# Altium PCB Fast_Servo.PCBDOC (part 4 of 11)
Units mm, origin at the board's own origin, x right, y up, seen from the top; angles counter-clockwise.
Board outline 162.48 x 100 mm, 6 copper layers (Top, GP1(GND), L3, L4, P3V3, Bot), stack 1.716 mm thick; 668 components, 491 nets, 2308 pads, 1133 vias.
Unrouted connection lines stored in the file: 2.
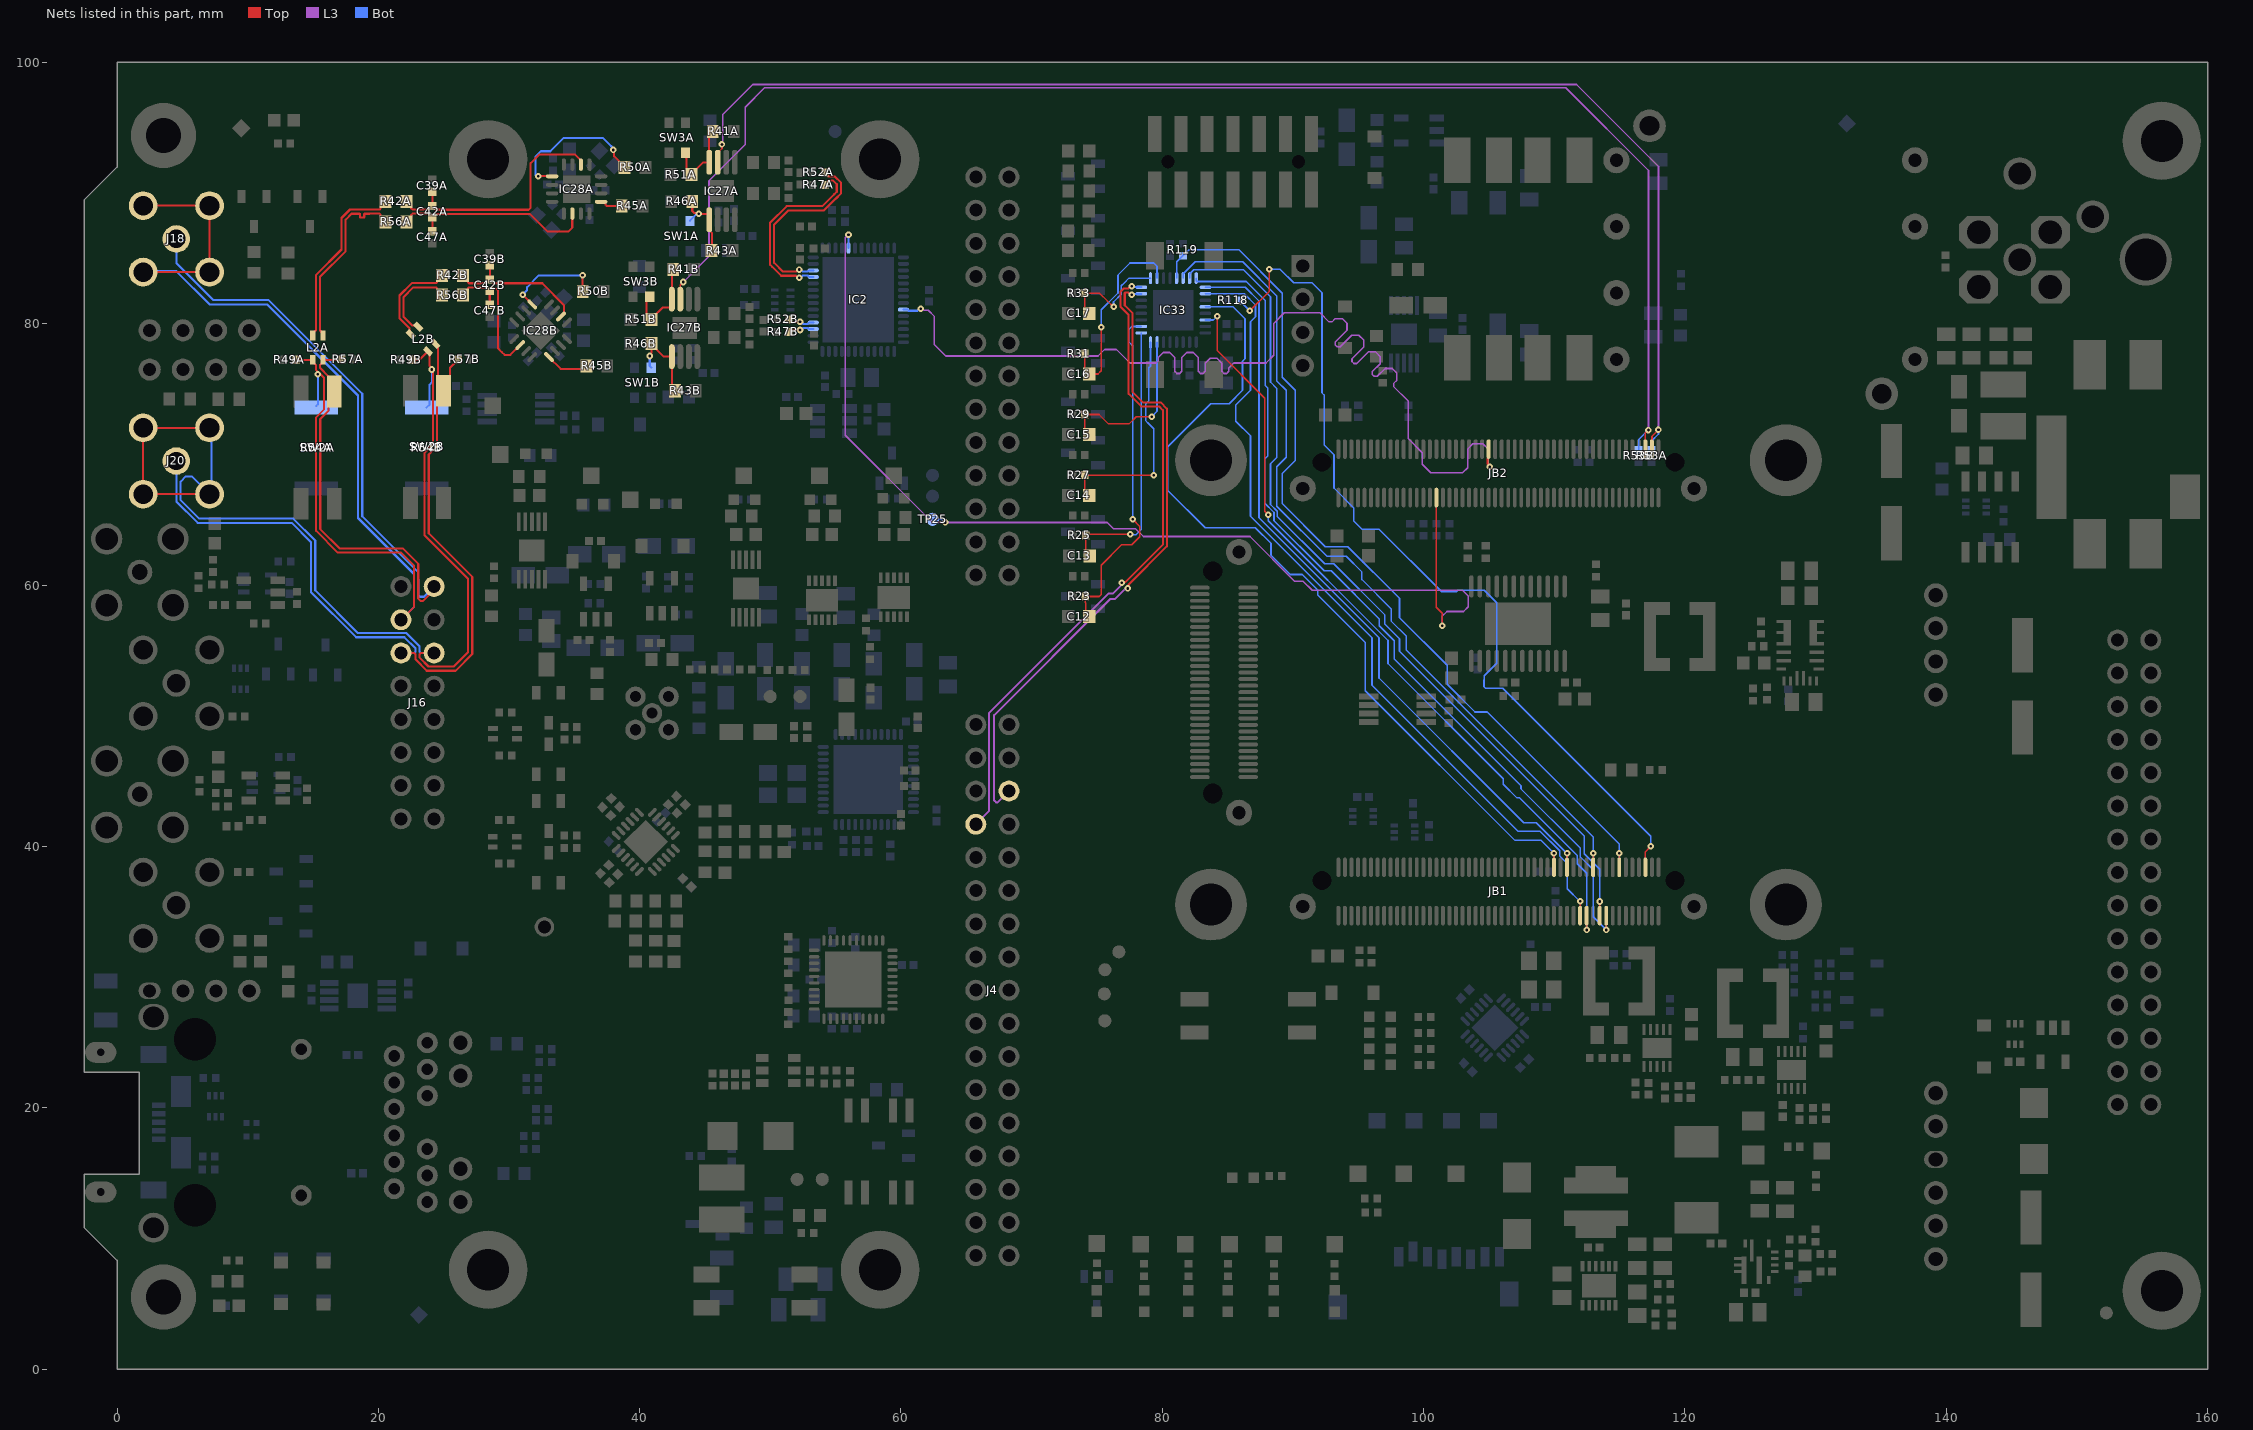
[diagram p7: the nets of this part, all layers, seen from the top]

## Part data (continued)
LD1 LD2: library part LED_DIALIGHT_571-0112F, "2x LED  Botom Green, Top Red", Manufacturer=DIALIGHT, Manufacturer Part Number=571-0112F, Author="CERN DEM JLC", Bonding=No, Color=Red/Green, ComponentHeight=8.6mm, Component Type=Standard, CreateDate=09/11/2009, HelpURL=\\cern.ch\dfs\Applications\Altium\Datasheets\LED_DIALIGHT_571-0112F.pdf, LatestRevisionDate=17/03/2010, Mounted=Yes, PackageDescription="2x 2mm LED (Top: Red, Bot: Green) PCB Edge Mounting (Without positioning pins) DIALIGHT 571 Serie", Part Description="Dual 2mm  LEDs, Red Top,Green Bot, CBI® Circuit Board Indicator (Without positioning pins)", Part Number=LED_DIALIGHT_571-0112F, Pin Count=4, PressFit=No, Sense=No, SMD=No, Socket=No
LD3: library part LED_DIALIGHT_571-0122F, "LED x2 Green 1C2A-BOT_3C4A-TOP", Manufacturer=DIALIGHT, Manufacturer Part Number=571-0122F, Author="CERN DEM JLC", Bonding=No, Color=Green/Green, ComponentHeight=8.6mm, Component Type=Standard, CreateDate=09.11.2009, HelpURL=\\cern.ch\dfs\Applications\Altium\Datasheets\LED_DIALIGHT_571-0122F.pdf, LatestRevisionDate=17.03.2010, Mounted=Yes, PackageDescription="2x 2mm Red LED PCB Edge Mounting (Without positioning pins) DIALIGHT 571 Serie", Part Description="Dual 2mm Green LEDs CBI® Circuit Board Indicator (Without positioning pins)", Part Number=LED_DIALIGHT_571-0122F, Pin Count=4, PressFit=No, Sense=No, SMD=No, Socket=No
LD4 LD5 LD6 LD7 LD8 LD9 LD10 LD11 LD12 LD13 LD14 LD15 LD16 LD17 LD18 LD19 LD20: library part LED_KINGBRIGHT_KPH-1608CGCK, "LED Green 1C 2A", Manufacturer=KINGBRIGHT, Manufacturer Part Number=KPH-1608CGCK, Author="CERN DEM JLC", Bonding=No, Color=Green, ComponentHeight=0.65mm, Component Type=Standard, HelpURL=\\cern.ch\dfs\Applications\Altium\Datasheets\LED_KINGBRIGHT_KPH-1608CGCK.pdf, Mounted=Yes, PackageDescription="SMT Green LED, Case 0603, Body L 1.6 x W 0.8mm H 0.65mm", Part Description="SMD Green LED, Case 1.6mmX0.8mm(0603), 0.65mm Thickness", Part Number=LED_KINGBRIGHT_KPH-1608CGCK, Pin Count=2, PressFit=No, Sense=No, SMD=Yes, Socket=No
  LD4 LD5: CreateDate=03-Jul-17, LatestRevisionDate=03-Jul-17
  LD6 LD7 LD8 LD9 LD10 LD11 LD12 LD13 LD14 LD15 LD16 LD17 LD18 LD19 LD20: CreateDate=03/07/2017, LatestRevisionDate=03/07/2017
OSC1: library part OSC_TC-100.000MBD-T, "Oscillator MEMS 100MHz ±25ppm", Manufacturer=TXC, Manufacturer Part Number=TC-100.000MBD-T, Author=GK, Bonding=No, Component Type=Standard, ComponentHeight=0.9mm, CreateDate=24.02.2021, HelpURL=\\cern.ch\dfs\Applications\Altium\Datasheets\OSC_MICROCHIP_DSC1001.pdf, LatestRevisionDate=24.02.2021, Mounted=Yes, PackageDescription="DFN, 4 pins, 3.2mm x 2.5mm", Part Description="1.8V-3.3V, ±25ppm, 15pF, -40..105°C, Surface Mount Low-Power Precision MEMS Oscillator", Part Number=TC-100.000MBD-T, Pin Count=4, PressFit=No, Sense=No, SMD=Yes, Socket=No
PB1: library part PB_TYCO_FSM6JSMA, "Push-Button Switch SPDT", Manufacturer="TYCO ELECTRONICS", Manufacturer Part Number="FSM6JSMA or  4-1437565-9", Author="CERN DEM JLC", ComponentHeight=7.11mm, Component Type=Standard, CreateDate=21-Jun-12, Family="Push Button", HelpURL=\\cern.ch\dfs\Applications\Altium\Datasheets\PB_TYCO_FSM6JSMA.pdf, LatestRevisionDate=21-Jun-12, Mounted=Yes, PackageDescription="Body 6mm x 6mm, Surface Mount Tactile Switches, TYCO ALCOSWITCH FSMJSMA Series", Part Description="12VDC 50mA SPST Tactile  Push-Button Switch", Part Number=PB_TYCO_FSM6JSMA, Pin Count=4, PressFit=No, Sense=No, SMD=Yes, Socket=No, Status=None
Q1: library part XTAL_48MHZ_TXC_7M-48.000MAHV, "Crystal 4 pins 1=XTAL Control 2=GND3=XTAL 4=GND", Manufacturer="TXC CORPORATION", Manufacturer Part Number=7M-48.000MAHV, Author="CERN DEM MR", Bonding=No, ComponentHeight=0.8mm, Component Type=Standard, CreateDate=30-May-16, HelpURL=\\cern.ch\dfs\Applications\Altium\Datasheets\XTAL_TXC_7M.pdf, LatestRevisionDate=30-May-16, Mounted=Yes, PackageDescription="4 Pins, 2.5x3.2mm, SMD Sealing Crystal, 7M Serie", Part Description="±30ppm 8pF -40°C to +85°C  4 Pins, 3.2x2.5X0.8mm, SMD Sealing Crystal, 7M Series", Part Number=XTAL_48MHZ_TXC_7M-48.000MAHV, Pin Count=4, PressFit=No, Sense=No, SMD=Yes, Socket=No
R1 R23 R24 R25 R26 R27 R28 R29 R30 R31 R32 R33 R34 R110 R112 R115 R133 R151 R158 R159 R161 R162: library part R0402_1K_1%_0.0625W_100PPM, "Resistor - 1%", Case=0402, Manufacturer=GENERIC, Manufacturer1 ComponentHeight=0.4mm, Manufacturer1 Example="YAGEO PHYCOMP", Manufacturer1 Part Number=232270671002L, Power=0.0625W, Tolerance=±1%, Author="CERN DEM JLC", Component Type=Standard, HelpURL=\\cern.ch\dfs\Applications\Altium\Datasheets\R0402_Phycomp_RC0402.pdf, Manufacturer Part Number=R0402_1K_1%_0.0625W_100PPM, Mounted=Yes, Part Description="General Purpose Thick Film Chip Resistor", Part Number=R0402_1K_1%_0.0625W_100PPM, Pin Count=2, PressFit=No, Sense=No, SMD=Yes, Socket=No, Status="Not Recommended", TC=±100ppm/°C
  R1: CreateDate=03-Dec-07, LatestRevisionDate=17-Oct-12
  R23 R24 R25 R26 R27 R28 R29 R30 R31 R32 R33 R34: CreateDate=03/12/2007, LatestRevisionDate=17/10/2012
  R110 R112 R115 R133 R151 R158 R159 R161 R162: CreateDate=03.12.2007, LatestRevisionDate=17.10.2012
R2 R3 R108 R109 R113 R114 R212 R215 R217 R223: library part R0402_2K4_1%_0.0625W_100PPM, "Resistor - 1%", Case=0402, Manufacturer=GENERIC, Manufacturer1 ComponentHeight=0.4mm, Manufacturer1 Example="YAGEO PHYCOMP", Manufacturer1 Part Number=232270672402L, Power=0.0625W, Tolerance=±1%, Author="CERN DEM JLC", Component Type=Standard, HelpURL=\\cern.ch\dfs\Applications\Altium\Datasheets\R0402_Phycomp_RC0402.pdf, Manufacturer Part Number=R0402_2K4_1%_0.0625W_100PPM, Mounted=Yes, Part Description="General Purpose Thick Film Chip Resistor", Part Number=R0402_2K4_1%_0.0625W_100PPM, Pin Count=2, PressFit=No, Sense=No, SMD=Yes, Socket=No, Status="Not Recommended", TC=±100ppm/°C
  R2 R3 R108 R114 R212 R215 R217 R223: CreateDate=03.12.2007, LatestRevisionDate=17.10.2012
  R109 R113: CreateDate=03-Dec-07, LatestRevisionDate=17-Oct-12
R4 R5 R7 R10 R11 R12 R15 R16 R17 R18 R19 R21 R39 R47A R47B R49A R49B R52A R52B R57A R57B R60 R62 R63 R64 R66 R70 R72 R73 R74 R76 R86 R116 R117 R137 R143 R145 R178 R185 R186 R188 R189 R190 R210 R227 R228 R229 R230 R231: library part R0402_0R_JUMPER, "Resistor", Case=0402, Manufacturer=GENERIC, Manufacturer1 ComponentHeight=0.4mm, Manufacturer1 Example="YAGEO PHYCOMP", Manufacturer1 Part Number=232270591001L, Author="CERN DEM JLC", Component Type=Standard, HelpURL=\\cern.ch\dfs\Applications\Altium\Datasheets\R0402_Phycomp_RC0402.pdf, Manufacturer Part Number=R0402_0R_JUMPER, Mounted=Yes, Part Description="1A (0.05R Max DC Resistance) Zero Ohm Jumper", Part Number=R0402_0R_JUMPER, Pin Count=2, Sense=No, SMD=Yes, Socket=No
  R4 R5 R47A R47B R52A R52B R62 R63 R64 R72 R73 R74: CreateDate=03-Dec-07, LatestRevisionDate=17-Oct-12, PressFit=No, Status="Not Recommended"
  R7 R10 R11 R12 R15 R16 R17 R18 R19 R21 R145 R178 R227 R228 R229 R230 R231: CreateDate=03.12.2007, LatestRevisionDate=17.10.2012, Status="Not recommended"
  R39 R49A R49B R57A R57B R60 R66 R70 R76 R86 R116 R117 R137 R143 R185 R186 R188 R189 R190: CreateDate=03/12/2007, LatestRevisionDate=17/10/2012, PressFit=No, Status="Not Recommended"
  R210: CreateDate=03.12.2007, LatestRevisionDate=17.10.2012, PressFit=No, Status="Not Recommended"
R6: library part R0402_1M_1%_0.0625W_100PPM, "Resistor - 1%", Case=0402, Manufacturer=GENERIC, Manufacturer1 ComponentHeight=0.4mm, Manufacturer1 Example="YAGEO PHYCOMP", Manufacturer1 Part Number=232270671005L, Power=0.0625W, Tolerance=±1%, Author="CERN DEM JLC", Component Type=Standard, CreateDate=03-Dec-07, HelpURL=\\cern.ch\dfs\Applications\Altium\Datasheets\R0402_Phycomp_RC0402.pdf, LatestRevisionDate=17-Oct-12, Manufacturer Part Number=R0402_1M_1%_0.0625W_100PPM, Mounted=Yes, Part Description="General Purpose Thick Film Chip Resistor", Part Number=R0402_1M_1%_0.0625W_100PPM, Pin Count=2, PressFit=No, Sense=No, SMD=Yes, Socket=No, Status="Not Recommended", TC=±100ppm/°C
R8 R9 R13 R14: library part R0603_20R_0.1%_0.063W_10PPM, "Resistor - 0.1%", Case=0603, Manufacturer=GENERIC, Manufacturer1 ComponentHeight=0.5mm, Manufacturer1 Example="TYCO HOLSWORTHY", Manufacturer1 Part Number=RN73C1J20RBTDF, Power=0.063W, Tolerance=±0.1%, Author="CERN DEM JLC", Component Type=Standard, CreateDate=03-Dec-07, HelpURL=\\cern.ch\dfs\Applications\Altium\Datasheets\R0603_Tyco_RN73.pdf, LatestRevisionDate=13-Mar-08, Manufacturer Part Number=R0603_20R_0.1%_0.063W_10PPM, Mounted=Yes, Part Description="Thin Film Chip Resistor", Part Number=R0603_20R_0.1%_0.063W_10PPM, Pin Count=2, PressFit=No, Sense=No, SMD=Yes, Socket=No, Status="Not Recommended", TC=±10ppm
R20 R53A R53B R68 R78 R83 R84 R90 R92 R100 R102 R107 R119 R120 R121 R122 R125 R128 R129 R132 R136 R138 R140 R142 R152 R155 R156 R157 R165 R177 R200 R205 R214 R218 R221 R222 R226: library part R0402_10K_1%_0.0625W_100PPM, "Resistor - 1%", Case=0402, Manufacturer=GENERIC, Manufacturer1 ComponentHeight=0.4mm, Manufacturer1 Example="YAGEO PHYCOMP", Manufacturer1 Part Number=232270671003L, Power=0.0625W, Tolerance=±1%, Author="CERN DEM JLC", Component Type=Standard, HelpURL=\\cern.ch\dfs\Applications\Altium\Datasheets\R0402_Phycomp_RC0402.pdf, Manufacturer Part Number=R0402_10K_1%_0.0625W_100PPM, Mounted=Yes, Part Description="General Purpose Thick Film Chip Resistor", Part Number=R0402_10K_1%_0.0625W_100PPM, Pin Count=2, Sense=No, SMD=Yes, Socket=No, TC=±100ppm/°C
  R20 R68 R78 R119 R120 R121 R122 R125 R138 R140 R155 R156 R157 R165 R200 R205: CreateDate=03-Dec-07, LatestRevisionDate=17-Oct-12, PressFit=No, Status="Not Recommended"
  R53A R53B R107 R132 R142 R152 R214 R218 R226: CreateDate=03.12.2007, LatestRevisionDate=17.10.2012, PressFit=No, Status="Not Recommended"
  R83 R84 R90 R92 R100 R102 R221 R222: CreateDate=03.12.2007, LatestRevisionDate=17.10.2012, Status="Not recommended"
  R128 R129 R136 R177: CreateDate=03/12/2007, LatestRevisionDate=17/10/2012, PressFit=No, Status="Not Recommended"
R22 R79 R80 R81 R82 R87 R88 R89 R93 R193 R207 R225: library part R0402_49R9_1%_0.0625W_100PPM, "Resistor - 1%", Case=0402, Manufacturer=GENERIC, Manufacturer1 ComponentHeight=0.4mm, Manufacturer1 Example="YAGEO PHYCOMP", Manufacturer1 Part Number="232270674999L or RC0402FR-0749R9L", Power=0.0625W, Tolerance=±1%, Author="CERN DEM JLC", Component Type=Standard, HelpURL=\\cern.ch\dfs\Applications\Altium\Datasheets\R0402_Phycomp_RC0402.pdf, Manufacturer Part Number=R0402_49R9_1%_0.0625W_100PPM, Mounted=Yes, Part Description="General Purpose Thick Film Chip Resistor", Part Number=R0402_49R9_1%_0.0625W_100PPM, Pin Count=2, SMD=Yes, Socket=No, TC=±100ppm/°C
  R22 R79 R80 R81 R82 R87 R88 R89 R93 R207 R225: CreateDate=24.10.2012, LatestRevisionDate=24.10.2012, PressFit=No, Sense=No, Status="Not Recommended"
  R193: CreateDate=2012-10-24, LatestRevisionDate=2012-10-24, Status="Not recommended", Table="Resistors SMD"
R35 R36 R37 R38 R40A R40B R58A R58B R96 R97 R98 R99 R101 R103 R106 R111 R146: library part R0603_220R_1%_0.1W_100PPM, "Resistor - 1%", Case=0603, Manufacturer=GENERIC, Manufacturer1 ComponentHeight=0.55mm, Manufacturer1 Example="NIC COMPONENT", Manufacturer1 Part Number=NRC06F2200TRF, Power=0.1W, Tolerance=±1%, Author="CERN DEM JLC", Component Type=Standard, HelpURL=\\cern.ch\dfs\Applications\Altium\Datasheets\R0603_NIC_NRC.pdf, Manufacturer Part Number=R0603_220R_1%_0.1W_100PPM, Mounted=Yes, Part Description="General Purpose Thick Film Chip Resistor", Part Number=R0603_220R_1%_0.1W_100PPM, Pin Count=2, Sense=No, SMD=Yes, Socket=No, Status=Preferred, TC=±100ppm/°C
  R35 R36 R37 R38: CreateDate=03/12/2007, LatestRevisionDate=13/03/2008, PressFit=No
  R40A R40B R58A R58B: CreateDate=03/12/2007, LatestRevisionDate=13/03/2008, PressFit=No, Table="Resistors SMD"
  R96 R97 R98 R99 R101 R103 R106 R111 R146: CreateDate=03.12.2007, LatestRevisionDate=13.03.2008
R41A R41B R43A R43B: library part R0603_249R_0.1%_0.063W_10PPM, "Resistor - 0.1%", Case=0603, Manufacturer=GENERIC, Manufacturer1 ComponentHeight=0.5mm, Manufacturer1 Example="TYCO HOLSWORTHY", Manufacturer1 Part Number=RN73C1J249RBTDF, Power=0.063W, Tolerance=±0.1%, Author="CERN DEM JLC", Component Type=Standard, CreateDate=03-Dec-07, HelpURL=\\cern.ch\dfs\Applications\Altium\Datasheets\R0603_Tyco_RN73.pdf, LatestRevisionDate=13-Mar-08, Manufacturer Part Number=R0603_249R_0.1%_0.063W_10PPM, Mounted=Yes, Part Description="Thin Film Chip Resistor", Part Number=R0603_249R_0.1%_0.063W_10PPM, Pin Count=2, PressFit=No, Sense=No, SMD=Yes, Socket=No, Status="Not Recommended", TC=±10ppm
R42A R42B R56A R56B: library part R0603_1K82_0.1%_0.063W_10PPM, "Resistor - 0.1%", Case=0603, Manufacturer=GENERIC, Manufacturer1 ComponentHeight=0.5mm, Manufacturer1 Example="TYCO HOLSWORTHY", Manufacturer1 Part Number=RN73C1J1K82BTDF, Power=0.063W, Tolerance=±0.1%, Author="CERN DEM JLC", Component Type=Standard, CreateDate=03/12/2007, HelpURL=\\cern.ch\dfs\Applications\Altium\Datasheets\R0603_Tyco_RN73.pdf, LatestRevisionDate=13/03/2008, Manufacturer Part Number=R0603_1K82_0.1%_0.063W_10PPM, Mounted=Yes, Part Description="Thin Film Chip Resistor", Part Number=R0603_1K82_0.1%_0.063W_10PPM, Pin Count=2, PressFit=No, Sense=No, SMD=Yes, Socket=No, Status="Not Recommended", TC=±10ppm
R44A R44B R55A R55B: library part R0402_50R_0.1%_0.05W_25PPM, "Resistor - 0.1%", Case=0402, Manufacturer=GENERIC, Manufacturer1 ComponentHeight=0.38mm, Manufacturer1 Example="VISHAY DALE", Manufacturer1 Part Number=FC0402E50R0BTBS, Power=0.05W, Tolerance=±0.1%, Author="CERN DEM JMW", Component Type=Standard, CreateDate=11-Aug-16, HelpURL=\\cern.ch\dfs\Applications\Altium\Datasheets\R0402_VISHAY_FC.pdf, LatestRevisionDate=11-Aug-16, Manufacturer Part Number=R0402_50R_0.1%_0.05W_25PPM, Mounted=Yes, Part Description="Thin Film Precision Resistor", Part Number=R0402_50R_0.1%_0.05W_25PPM, Pin Count=2, PressFit=No, Sense=No, SMD=Yes, Socket=No, Status="Not Recommended", TC=±25ppm/°C
R45A R45B R50A R50B R201A R201B R203A R203B: library part R0603_31R6_0.1%_0.063W_10PPM, "Resistor - 0.1%", Case=0603, Manufacturer=GENERIC, Manufacturer1 ComponentHeight=0.5mm, Manufacturer1 Example="TYCO HOLSWORTHY", Manufacturer1 Part Number=RN73C1J31R6BTDF, Power=0.063W, Tolerance=±0.1%, Author="CERN DEM JLC", Component Type=Standard, CreateDate=03.12.2007, HelpURL=\\cern.ch\dfs\Applications\Altium\Datasheets\R0603_Tyco_RN73.pdf, LatestRevisionDate=13.03.2008, Manufacturer Part Number=R0603_31R6_0.1%_0.063W_10PPM, Mounted=Yes, Part Description="Thin Film Chip Resistor", Part Number=R0603_31R6_0.1%_0.063W_10PPM, Pin Count=2, PressFit=No, Sense=No, SMD=Yes, Socket=No, Status="Not Recommended", TC=±10ppm
R46A R46B R51A R51B R85 R91: library part R0603_340R_0.1%_0.063W_10PPM, "Resistor - 0.1%", Case=0603, Manufacturer=GENERIC, Manufacturer1 ComponentHeight=0.5mm, Manufacturer1 Example="TYCO HOLSWORTHY", Manufacturer1 Part Number=RN73C1J340RBTDF, Power=0.063W, Tolerance=±0.1%, Author="CERN DEM JLC", Component Type=Standard, HelpURL=\\cern.ch\dfs\Applications\Altium\Datasheets\R0603_Tyco_RN73.pdf, Manufacturer Part Number=R0603_340R_0.1%_0.063W_10PPM, Mounted=Yes, Part Description="Thin Film Chip Resistor", Part Number=R0603_340R_0.1%_0.063W_10PPM, Pin Count=2, PressFit=No, Sense=No, SMD=Yes, Socket=No, Status="Not Recommended", TC=±10ppm
  R46A R46B R51A R51B: CreateDate=03/12/2007, LatestRevisionDate=13/03/2008
  R85 R91: CreateDate=03.12.2007, LatestRevisionDate=13.03.2008
R48A R48B: library part R0603_200R_0.1%_0.063W_10PPM, "Resistor - 0.1%", Case=0603, Manufacturer=GENERIC, Manufacturer1 ComponentHeight=0.5mm, Manufacturer1 Example="TYCO HOLSWORTHY", Manufacturer1 Part Number=RN73C1J200RBTDF, Power=0.063W, Tolerance=±0.1%, Author="CERN DEM JLC", Component Type=Standard, CreateDate=03-Dec-07, HelpURL=\\cern.ch\dfs\Applications\Altium\Datasheets\R0603_Tyco_RN73.pdf, LatestRevisionDate=13-Mar-08, Manufacturer Part Number=R0603_200R_0.1%_0.063W_10PPM, Mounted=Yes, Part Description="Thin Film Chip Resistor", Part Number=R0603_200R_0.1%_0.063W_10PPM, Pin Count=2, PressFit=No, Sense=No, SMD=Yes, Socket=No, Status="Not Recommended", TC=±10ppm
R54A R54B: library part R2512_49R9_1%_1W_100PPM_VISHAY_CRCW, "Resistor - 1%", Case=2512, Manufacturer="VISHAY DRALORIC", Manufacturer Part Number=CRCW251249R9FKEG, Power=1W, Tolerance=±1%, Author="CERN DEM JLC", ComponentHeight=0.7mm, Component Type=Standard, CreateDate=22.05.2012, HelpURL=\\cern.ch\dfs\Applications\Altium\Datasheets\R2512_VISHAY_CRCW2512.pdf, LatestRevisionDate=22.05.2012, Mounted=Yes, Part Description="Thick Film Chip Resistor", Part Number=R2512_49R9_1%_1W_100PPM_VISHAY_CRCW, Pin Count=2, PressFit=No, Sense=No, SMD=Yes, Socket=No, Status=None, TC=±100ppm/°C
R59 R67 R69 R77: library part R0603_499R_0.1%_0.063W_10PPM, "Resistor - 0.1%", Case=0603, Manufacturer=GENERIC, Manufacturer1 ComponentHeight=0.5mm, Manufacturer1 Example="TYCO HOLSWORTHY", Manufacturer1 Part Number=RN73C1J499RBTDF, Power=0.063W, Tolerance=±0.1%, Author="CERN DEM JLC", Component Type=Standard, CreateDate=03-Dec-07, HelpURL=\\cern.ch\dfs\Applications\Altium\Datasheets\R0603_Tyco_RN73.pdf, LatestRevisionDate=13-Mar-08, Manufacturer Part Number=R0603_499R_0.1%_0.063W_10PPM, Mounted=Yes, Part Description="Thin Film Chip Resistor", Part Number=R0603_499R_0.1%_0.063W_10PPM, Pin Count=2, PressFit=No, Sense=No, SMD=Yes, Socket=No, Status="Not Recommended", TC=±10ppm
R61 R65 R71 R75: library part R0603_348R_0.1%_0.063W_10PPM, "Resistor - 0.1%", Case=0603, Manufacturer=GENERIC, Manufacturer1 ComponentHeight=0.5mm, Manufacturer1 Example="TYCO HOLSWORTHY", Manufacturer1 Part Number=RN73C1J348RBTDF, Power=0.063W, Tolerance=±0.1%, Author="CERN DEM JLC", Component Type=Standard, CreateDate=03-Dec-07, HelpURL=\\cern.ch\dfs\Applications\Altium\Datasheets\R0603_Tyco_RN73.pdf, LatestRevisionDate=13-Mar-08, Manufacturer Part Number=R0603_348R_0.1%_0.063W_10PPM, Mounted=Yes, Part Description="Thin Film Chip Resistor", Part Number=R0603_348R_0.1%_0.063W_10PPM, Pin Count=2, PressFit=No, Sense=No, SMD=Yes, Socket=No, Status="Not Recommended", TC=±10ppm
R94 R95 R118 R160 R194 R195 R196 R197 R198 R199: library part R0402_33R_1%_0.0625W_100PPM, "Resistor - 1%", Case=0402, Manufacturer=GENERIC, Manufacturer1 ComponentHeight=0.4mm, Manufacturer1 Example="YAGEO PHYCOMP", Manufacturer1 Part Number=232270673309L, Power=0.0625W, Tolerance=±1%, Author="CERN DEM JLC", Component Type=Standard, HelpURL=\\cern.ch\dfs\Applications\Altium\Datasheets\R0402_Phycomp_RC0402.pdf, Manufacturer Part Number=R0402_33R_1%_0.0625W_100PPM, Mounted=Yes, Part Description="General Purpose Thick Film Chip Resistor", Part Number=R0402_33R_1%_0.0625W_100PPM, Pin Count=2, PressFit=No, Sense=No, SMD=Yes, Socket=No, Status="Not Recommended", TC=±100ppm/°C
  R94 R95 R194 R195 R196 R197 R198 R199: CreateDate=03/12/2007, LatestRevisionDate=17/10/2012
  R118: CreateDate=03-Dec-07, LatestRevisionDate=17-Oct-12
  R160: CreateDate=03.12.2007, LatestRevisionDate=17.10.2012
R104 R105: library part R0402_1k_1%_0.0625W_100PPM, "Resistor - 1%", Case=0402, Manufacturer=GENERIC, Manufacturer1 ComponentHeight=0.4mm, Manufacturer1 Example="YAGEO PHYCOMP", Manufacturer1 Part Number=232270671002L, Manufacturer Part Number=R0402_1K_1%_0.0625W_100PPM, Power=0.0625W, Tolerance=±1%, Author="CERN DEM JLC", ClassName=Artix, Component Type=Standard, CreateDate=03.12.2007, HelpURL=\\cern.ch\dfs\Applications\Altium\Datasheets\R0402_Phycomp_RC0402.pdf, LatestRevisionDate=17.10.2012, Mounted=Yes, Part Description="General Purpose Thick Film Chip Resistor", Part Number=R0402_1K_1%_0.0625W_100PPM, Pin Count=2, PressFit=No, Sense=No, SMD=Yes, Socket=No, Status="Not Recommended", TC=±100ppm/°C
R123 R124 R183 R192 R211: library part R0402_200K_1%_0.0625W_100PPM, "Resistor - 1%", Case=0402, Manufacturer=GENERIC, Manufacturer1 ComponentHeight=0.4mm, Manufacturer1 Example="YAGEO PHYCOMP", Manufacturer1 Part Number=232270672004L, Power=0.0625W, Tolerance=±1%, Author="CERN DEM JLC", Component Type=Standard, CreateDate=03/12/2007, HelpURL=\\cern.ch\dfs\Applications\Altium\Datasheets\R0402_Phycomp_RC0402.pdf, LatestRevisionDate=17/10/2012, Manufacturer Part Number=R0402_200K_1%_0.0625W_100PPM, Mounted=Yes, Part Description="General Purpose Thick Film Chip Resistor", Part Number=R0402_200K_1%_0.0625W_100PPM, Pin Count=2, PressFit=No, Sense=No, SMD=Yes, Socket=No, Status="Not Recommended", TC=±100ppm/°C
R126 R130 R202: library part R0402_39K_1%_0.0625W_100PPM, "Resistor - 1%", Case=0402, Manufacturer=GENERIC, Manufacturer1 ComponentHeight=0.4mm, Manufacturer1 Example="YAGEO PHYCOMP", Manufacturer1 Part Number=232270673903, Power=0.0625W, Tolerance=±1%, Author="CERN DEM JLC", Component Type=Standard, CreateDate=03.12.2007, HelpURL=\\cern.ch\dfs\Applications\Altium\Datasheets\R0402_Phycomp_RC0402.pdf, LatestRevisionDate=17.10.2012, Manufacturer Part Number=R0402_39K_1%_0.0625W_100PPM, Mounted=Yes, Part Description="General Purpose Thick Film Chip Resistor", Part Number=R0402_39K_1%_0.0625W_100PPM, Pin Count=2, PressFit=No, Sense=No, SMD=Yes, Socket=No, Status="Not Recommended", TC=±100ppm/°C
R127 R179 R204: library part R0402_36K_1%_0.0625W_100PPM, "Resistor - 1%", Case=0402, Manufacturer=GENERIC, Manufacturer1 ComponentHeight=0.4mm, Manufacturer1 Example="YAGEO PHYCOMP", Manufacturer1 Part Number=232270673603L, Power=0.0625W, Tolerance=±1%, Author="CERN DEM JLC", Component Type=Standard, CreateDate=03.12.2007, HelpURL=\\cern.ch\dfs\Applications\Altium\Datasheets\R0402_Phycomp_RC0402.pdf, LatestRevisionDate=17.10.2012, Manufacturer Part Number=R0402_36K_1%_0.0625W_100PPM, Mounted=Yes, Part Description="General Purpose Thick Film Chip Resistor", Part Number=R0402_36K_1%_0.0625W_100PPM, Pin Count=2, PressFit=No, Sense=No, SMD=Yes, Socket=No, Status="Not Recommended", TC=±100ppm/°C
R131 R166: library part R0402_62K_1%_0.0625W_100PPM, "Resistor - 1%", Case=0402, Manufacturer=GENERIC, Manufacturer1 ComponentHeight=0.4mm, Manufacturer1 Example="YAGEO PHYCOMP", Manufacturer1 Part Number=232270676203L, Power=0.0625W, Tolerance=±1%, Author="CERN DEM JLC", Component Type=Standard, CreateDate=03.12.2007, HelpURL=\\cern.ch\dfs\Applications\Altium\Datasheets\R0402_Phycomp_RC0402.pdf, LatestRevisionDate=17.10.2012, Manufacturer Part Number=R0402_62K_1%_0.0625W_100PPM, Mounted=Yes, Part Description="General Purpose Thick Film Chip Resistor", Part Number=R0402_62K_1%_0.0625W_100PPM, Pin Count=2, PressFit=No, Sense=No, SMD=Yes, Socket=No, Status="Not Recommended", TC=±100ppm/°C
R134 R171 R191 R220: library part R0603_24K9_0.1%_0.063W_10PPM, "Resistor - 0.1%", Case=0603, Manufacturer=GENERIC, Manufacturer1 ComponentHeight=0.5mm, Manufacturer1 Example="TYCO HOLSWORTHY", Manufacturer1 Part Number=RN73C1J24K9BTDF, Power=0.063W, Tolerance=±0.1%, Author="CERN DEM JLC", Component Type=Standard, HelpURL=\\cern.ch\dfs\Applications\Altium\Datasheets\R0603_Tyco_RN73.pdf, Manufacturer Part Number=R0603_24K9_0.1%_0.063W_10PPM, Mounted=Yes, Part Description="Thin Film Chip Resistor", Part Number=R0603_24K9_0.1%_0.063W_10PPM, Pin Count=2, PressFit=No, Sense=No, SMD=Yes, Socket=No, Status="Not Recommended", TC=±10ppm
  R134 R220: CreateDate=03-Dec-07, LatestRevisionDate=13-Mar-08
  R171 R191: CreateDate=03.12.2007, LatestRevisionDate=13.03.2008
R135: library part R0402_270K_1%_0.0625W_100PPM, "Resistor - 1%", Case=0402, Manufacturer=GENERIC, Manufacturer1 ComponentHeight=0.4mm, Manufacturer1 Example="YAGEO PHYCOMP", Manufacturer1 Part Number=232270672704L, Power=0.0625W, Tolerance=±1%, Author="CERN DEM JLC", Component Type=Standard, CreateDate=03.12.2007, HelpURL=\\cern.ch\dfs\Applications\Altium\Datasheets\R0402_Phycomp_RC0402.pdf, LatestRevisionDate=17.10.2012, Manufacturer Part Number=R0402_270K_1%_0.0625W_100PPM, Mounted=Yes, Part Description="General Purpose Thick Film Chip Resistor", Part Number=R0402_270K_1%_0.0625W_100PPM, Pin Count=2, PressFit=No, Sense=No, SMD=Yes, Socket=No, Status="Not Recommended", TC=±100ppm/°C
R139: library part R1206_0R_JUMPER_SEI_HCJ, "Resistor", Case=1206, Manufacturer="SEI (STACKPOLE ELECTRONICS INC.)", Manufacturer Part Number=HCJ1206ZT0R00, Author="CERN DEM MR", ComponentHeight=0.8mm, Component Type=Standard, CreateDate=20/02/2018, HelpURL=\\cern.ch\dfs\Applications\Altium\Datasheets\R1206_SEI_HCJ.pdf, LatestRevisionDate=20/02/2018, Mounted=Yes, Part Description="38.7A (0.0005R Max DC Resistance) Zero Ohm Jumper", Part Number=R1206_0R_JUMPER_SEI_HCJ, Pin Count=2, PressFit=No, Sense=No, SMD=Yes, Socket=No, Status="Not Recommended"
R141 R148 R167 R182 R213 R216: library part R0402_20K_1%_0.0625W_100PPM, "Resistor - 1%", Case=0402, Manufacturer=GENERIC, Manufacturer1 ComponentHeight=0.4mm, Manufacturer1 Example="YAGEO PHYCOMP", Manufacturer1 Part Number=232270672003L, Power=0.0625W, Tolerance=±1%, Author="CERN DEM JLC", Component Type=Standard, CreateDate=03.12.2007, HelpURL=\\cern.ch\dfs\Applications\Altium\Datasheets\R0402_Phycomp_RC0402.pdf, LatestRevisionDate=17.10.2012, Manufacturer Part Number=R0402_20K_1%_0.0625W_100PPM, Mounted=Yes, Part Description="General Purpose Thick Film Chip Resistor", Part Number=R0402_20K_1%_0.0625W_100PPM, Pin Count=2, PressFit=No, Sense=No, SMD=Yes, Socket=No, Status="Not Recommended", TC=±100ppm/°C
R144 R150 R153 R208 R224: library part R0603_82K_1%_0.1W_100PPM, "Resistor - 1%", Case=0603, Manufacturer=GENERIC, Manufacturer1 ComponentHeight=0.55mm, Manufacturer1 Example="NIC COMPONENT", Manufacturer1 Part Number=NRC06F8202TRF, Power=0.1W, Tolerance=±1%, Author="CERN DEM JLC", Component Type=Standard, CreateDate=03.12.2007, HelpURL=\\cern.ch\dfs\Applications\Altium\Datasheets\R0603_NIC_NRC.pdf, LatestRevisionDate=13.03.2008, Manufacturer Part Number=R0603_82K_1%_0.1W_100PPM, Mounted=Yes, Part Description="General Purpose Thick Film Chip Resistor", Part Number=R0603_82K_1%_0.1W_100PPM, Pin Count=2, Sense=No, SMD=Yes, Socket=No, Status=Preferred, TC=±100ppm/°C
  R208 R224: PressFit=No
R147 R176 R209: library part R0603_NO-VALUE, "Resistor", Case=0603, Author="CERN DEM JLC", Component Type=Standard, CreateDate=03.12.2007, HelpURL=Undefined, LatestRevisionDate=13.03.2008, Manufacturer=Undefined, Manufacturer1 ComponentHeight=Undefined, Manufacturer1 Example=Undefined, Manufacturer1 Part Number=Undefined, Manufacturer Part Number=R0603_NO-VALUE, Mounted=No, Part Description="Reserved Footprint For a 0603 (1608) Chip Resistor", Part Number=R0603_NO-VALUE, Pin Count=2, Sense=No, SMD=Yes, Socket=No, Status=None
  R147 R209: PressFit=No
R149 R172: library part R0402_10R_1%_0.0625W_200PPM, "Resistor - 1%", Case=0402, Manufacturer=GENERIC, Manufacturer1 ComponentHeight=0.4mm, Manufacturer1 Example="YAGEO PHYCOMP", Manufacturer1 Part Number=232270671009L, Power=0.0625W, Tolerance=±1%, Author="CERN DEM JLC", Component Type=Standard, CreateDate=24/06/2009, HelpURL=\\cern.ch\dfs\Applications\Altium\Datasheets\R0402_Phycomp_RC0402.pdf, LatestRevisionDate=17/10/2012, Manufacturer Part Number=R0402_10R_1%_0.0625W_200PPM, Mounted=Yes, Part Description="General Purpose Thick Film Chip Resistor", Part Number=R0402_10R_1%_0.0625W_200PPM, Pin Count=2, PressFit=No, Sense=No, SMD=Yes, Socket=No, Status="Not Recommended", TC=±200ppm/°C
R154 R169: library part R0603_33K2_0.1%_0.063W_10PPM, "Resistor - 0.1%", Case=0603, Manufacturer=GENERIC, Manufacturer1 ComponentHeight=0.5mm, Manufacturer1 Example="TYCO HOLSWORTHY", Manufacturer1 Part Number=RN73C1J33K2BTDF, Power=0.063W, Tolerance=±0.1%, Author="CERN DEM JLC", Component Type=Standard, CreateDate=03.12.2007, HelpURL=\\cern.ch\dfs\Applications\Altium\Datasheets\R0603_Tyco_RN73.pdf, LatestRevisionDate=13.03.2008, Manufacturer Part Number=R0603_33K2_0.1%_0.063W_10PPM, Mounted=Yes, Part Description="Thin Film Chip Resistor", Part Number=R0603_33K2_0.1%_0.063W_10PPM, Pin Count=2, PressFit=No, Sense=No, SMD=Yes, Socket=No, Status="Not Recommended", TC=±10ppm
R164: library part R0603_18K_1%_0.1W_100PPM, "Resistor - 1%", Case=0603, Manufacturer=GENERIC, Manufacturer1 ComponentHeight=0.55mm, Manufacturer1 Example="NIC COMPONENT", Manufacturer1 Part Number=NRC06F1802TRF, Power=0.1W, Tolerance=±1%, Author="CERN DEM JLC", Component Type=Standard, CreateDate=03/12/2007, HelpURL=\\cern.ch\dfs\Applications\Altium\Datasheets\R0603_NIC_NRC.pdf, LatestRevisionDate=13/03/2008, Manufacturer Part Number=R0603_18K_1%_0.1W_100PPM, Mounted=Yes, Part Description="General Purpose Thick Film Chip Resistor", Part Number=R0603_18K_1%_0.1W_100PPM, Pin Count=2, PressFit=No, Sense=No, SMD=Yes, Socket=No, Status=Preferred, TC=±100ppm/°C
R173 R174 R187 R206 R219: library part R0402_4K7_1%_0.0625W_100PPM, "Resistor - 1%", Case=0402, Manufacturer=GENERIC, Manufacturer1 ComponentHeight=0.4mm, Manufacturer1 Example="YAGEO PHYCOMP", Manufacturer1 Part Number=232270674702L, Power=0.0625W, Tolerance=±1%, Author="CERN DEM JLC", Component Type=Standard, HelpURL=\\cern.ch\dfs\Applications\Altium\Datasheets\R0402_Phycomp_RC0402.pdf, Manufacturer Part Number=R0402_4K7_1%_0.0625W_100PPM, Mounted=Yes, Part Description="General Purpose Thick Film Chip Resistor", Part Number=R0402_4K7_1%_0.0625W_100PPM, Pin Count=2, PressFit=No, Sense=No, SMD=Yes, Socket=No, Status="Not Recommended", TC=±100ppm/°C
  R173 R174: CreateDate=12/3/2007, LatestRevisionDate=10/17/2012
  R187 R206 R219: CreateDate=03.12.2007, LatestRevisionDate=17.10.2012
R175: library part R0603_120k_1%_0.1W_100PPM, "Resistor - 1%", Case=0603, Manufacturer=GENERIC, Manufacturer1 ComponentHeight=0.55mm, Manufacturer1 Example="NIC COMPONENT", Manufacturer1 Part Number=NRC06F1203TRF, Manufacturer Part Number=R0603_120K_1%_0.1W_100PPM, Power=0.1W, Tolerance=±1%, Author="CERN DEM JLC", Component Type=Standard, CreateDate=03.12.2007, HelpURL=\\cern.ch\dfs\Applications\Altium\Datasheets\R0603_NIC_NRC.pdf, LatestRevisionDate=13.03.2008, Mounted=Yes, Part Description="General Purpose Thick Film Chip Resistor", Part Number=R0603_120K_1%_0.1W_100PPM, Pin Count=2, PressFit=No, Sense=No, SMD=Yes, Socket=No, Status=Preferred, TC=±100ppm/°C
R180: library part R0603_24K_1%_0.1W_100PPM, "Resistor - 1%", Case=0603, Manufacturer=GENERIC, Manufacturer1 ComponentHeight=0.55mm, Manufacturer1 Example="NIC COMPONENT", Manufacturer1 Part Number=NRC06F2402TRF, Power=0.1W, Tolerance=±1%, Author="CERN DEM JLC", Component Type=Standard, CreateDate=03.12.2007, HelpURL=\\cern.ch\dfs\Applications\Altium\Datasheets\R0603_NIC_NRC.pdf, LatestRevisionDate=13.03.2008, Manufacturer Part Number=R0603_24K_1%_0.1W_100PPM, Mounted=Yes, Part Description="General Purpose Thick Film Chip Resistor", Part Number=R0603_24K_1%_0.1W_100PPM, Pin Count=2, Sense=No, SMD=Yes, Socket=No, Status=Preferred, TC=±100ppm/°C
R181: library part R0603_2K7_1%_0.1W_100PPM, "Resistor - 1%", Case=0603, Manufacturer=GENERIC, Manufacturer1 ComponentHeight=0.55mm, Manufacturer1 Example="YAGEO PHYCOMP", Manufacturer1 Part Number=RC0603FR-072K7L, Power=0.1W, Tolerance=±1%, Author="CERN DEM JLC", Component Type=Standard, CreateDate=02.05.2011, HelpURL=\\cern.ch\dfs\Applications\Altium\Datasheets\R0603_PHYCOMP_RC0603.pdf, LatestRevisionDate=02.05.2011, Manufacturer Part Number=R0603_2K7_1%_0.1W_100PPM, Mounted=Yes, Part Description="General Purpose Thick Film Chip Resistor", Part Number=R0603_2K7_1%_0.1W_100PPM, Pin Count=2, Sense=No, SMD=Yes, Socket=No, Status=Preferred, TC=±100ppm/°C
R184: library part R0402_2K_1%_0.0625W_100PPM, "Resistor - 1%", Case=0402, Manufacturer=GENERIC, Manufacturer1 ComponentHeight=0.4mm, Manufacturer1 Example="YAGEO PHYCOMP", Manufacturer1 Part Number=232270672002L, Power=0.0625W, Tolerance=±1%, Author="CERN DEM JLC", Component Type=Standard, CreateDate=03/12/2007, HelpURL=\\cern.ch\dfs\Applications\Altium\Datasheets\R0402_Phycomp_RC0402.pdf, LatestRevisionDate=17/10/2012, Manufacturer Part Number=R0402_2K_1%_0.0625W_100PPM, Mounted=Yes, Part Description="General Purpose Thick Film Chip Resistor", Part Number=R0402_2K_1%_0.0625W_100PPM, Pin Count=2, PressFit=No, Sense=No, SMD=Yes, Socket=No, Status="Not Recommended", TC=±100ppm/°C
ST1: library part SCHROFF_PANEL_3U_4HP_Stabilizer, "Schroff 3HP 4U EUROCARD Panel", Manufacturer=Schroff, Manufacturer Part Number=20818-017, Manufacturer Part Number 2=20848-664
SW1A SW1B SW3A SW3B: "PhotoMOS Relay", Case=SON4, Manufacturer=PANASONIC, Author="CERN DEM JLC", Bonding=No, ComponentHeight=1.4mm, ComponentLink1Description="Package Drawing", ComponentLink1URL=\\cern.ch\dfs\Applications\Altium\Datasheets\AQY221N3M_Package-Drawing.pdf, Component Type=Standard, CreateDate=18/01/2010, Device=AQY221N3M, HelpURL=\\cern.ch\dfs\Applications\Altium\Datasheets\AQY221N3M.pdf, LatestRevisionDate=05/12/2018, Manufacturer Part Number=AQY221N3M, Mounted=Yes, PackageDescription="PANASONIC Serie AQY22(SON)  Small Outline No Lead, 4 pins, 2.2x2.95mm", Part Description="RF SON 1 Form A, PhotoMOS Relay, CxR5 (On Res. 5.5Ohm, Out Cap. 1.1pF), 25V 150mA", Part Number=AQY221N3M, Pin Count=4, PressFit=No, Sense=No, SMD=Yes, Socket=No, Table=Optocouplers
SW2A SW2B: library part SW_CTS_204-121ST, "2x SPST DIP Switch 1NO + 1NF", Manufacturer=CTS, Manufacturer Part Number=204-121ST, Author="CERN DEM JLC", ComponentHeight=10.36mm, Component Type=Standard, CreateDate=28.08.2014, Family=Switch, HelpURL=\\cern.ch\dfs\Applications\Altium\Datasheets\SW_CTS_204-121ST.pdf, LatestRevisionDate=28.08.2014, Mounted=Yes, PackageDescription="Body 7.26 x 9.78mm, 2x SPST DIP, 1NO + 1NF Switch, CTS 204 Series", Part Description="Coupled SPST DIP Switch, 1NO + 1NF, CTS 204 Series", Part Number=SW_CTS_204-121ST, Pin Count=4, PressFit=No, Sense=No, SMD=Yes, Socket=No, Status=None
SW4: library part SW_OMRON_A6SN-2101, "2 Ways SPST DIP Switch", Manufacturer=OMRON, Manufacturer Part Number=A6SN-2101, Author="CERN DEM MR", ComponentHeight=4.6mm, Component Type=Standard, CreateDate=04-Nov-16, Family=Switch, HelpURL=\\cern.ch\dfs\Applications\Altium\Datasheets\SW_OMRON_A6SN-2101.pdf, LatestRevisionDate=04-Nov-16, Mounted=Yes, PackageDescription="Pitch 2.54mm, Body 7x7.5, 2 Ways SPST Surface-Mounting Slide Switch With Flat Actuator (A6SN Series)", Part Description="2 Ways SPST Surface-Mounting Slide Switch With Flat Actuator, Contact Rating 25mA 24VDC", Part Number=SW_OMRON_A6SN-2101, Pin Count=4, PressFit=No, Sense=No, SMD=Yes, Socket=No, Status=None
T1 T2 T3 T4 T8 T9 T10 T11 T12 T13 T14: "N-CHANNEL MOSFET WITH DIODE", Case=SOT23-3, Manufacturer=NEXPERIA, Author="CERN DEM JLC", Bonding=No, Component Type=Standard, ComponentHeight=1.1mm, CreateDate=16.03.2010, Device=BSH103, HelpURL=\\cern.ch\dfs\Applications\Altium\Datasheets\BSH103.pdf, LatestRevisionDate=20.06.2017, Manufacturer Part Number=BSH103, Mounted=Yes, Part Description="30V 850mA N-Channel Enhancement Mode Field-Effect Transistor", Part Number=BSH103, Pin Count=3, PressFit=No, Sense=No, SMD=Yes, Socket=No
  T1 T2 T8: PackageDescription="SOT23, 0.95mm Pitch; 3 Pin, 1.30mm W X 2.90mm L X 1.10mm H body, IPC Medium Density"
  T3 T4 T9 T10 T11 T12 T13 T14: ClassName=Artix, PackageDescription="SOT23, 3 pin, Pitch 0.95mm - 1.3mm W X 2.9mm L X 1.1mm H, IPC Medium Density"
T5: "-30V -19.7A P-Channel MOSFET", Case=SOIC8, Manufacturer="VISHAY SILICONIX", Author="CERN DEM MR", Bonding=No, ComponentHeight=1.75mm, Component Type=Standard, CreateDate=05/10/2016, Device=SI4425DDY-T1-GE3, HelpURL=\\cern.ch\dfs\Applications\Altium\Datasheets\SI4425DDY-T1-GE3.pdf, LatestRevisionDate=05/10/2016, Manufacturer Part Number=SI4425DDY-T1-GE3, Mounted=Yes, PackageDescription="SOIC 8, Pitch 1.27mm - Body 4x5mm, IPC Medium Density", Part Description="-30V -19.7A P-Channel MOSFET", Part Number=SI4425DDY-T1-GE3, Pin Count=8, PressFit=No, Sense=No, SMD=Yes, Socket=No
T6: "N-CHANNEL MOSFET WITH DIODE", Case=SOT23-3, Manufacturer="ON SEMICONDUCTOR", Author="CERN DEM BC", Bonding=No, ComponentHeight=1.12mm, ComponentLink1Description="Package Drawing", ComponentLink1URL=\\cern.ch\dfs\Applications\Altium\Datasheets\FDN86246_Package.pdf, Component Type=Standard, CreateDate=10.10.2019, Device=FDN86246, HelpURL=\\cern.ch\dfs\Applications\Altium\Datasheets\FDN86246.pdf, LatestRevisionDate=10.10.2019, Manufacturer Part Number=FDN86246, Mounted=Yes, PackageDescription="SOT, 0.95mm, pitch; 3 pin,1.30mm W X 2.92mm L X 1.12mm H body, IPC Medium Density", Part Description="150V 1.6A N-Channel Power Trench® MOSFET", Part Number=FDN86246, Pin Count=3, PressFit=No, Sense=No, SMD=Yes, Socket=No
T7: "45V, 100mA PNP General Purpose Double Transistor", Case=SOT666, Manufacturer="NXP SEMICONDUCTORS", Author="CERN DEM JLC", Bonding=No, ComponentHeight=0.6mm, Component Type=Standard, CreateDate=01/12/2011, Device=BC857BV, HelpURL=\\cern.ch\dfs\Applications\Altium\Datasheets\BC857BV.pdf, LatestRevisionDate=01/12/2011, Manufacturer Part Number=BC857BV, Mounted=Yes, PackageDescription="SOTFL (SOT666), 0.50mm, Pitch; 6 Pin, 1.20mm W X 1.60mm L X 0.60mm H Body, IPC Medium Density", Part Description="-45V -100mA PNP General Purpose Double Transistor", Part Number=BC857BV, Pin Count=6, PressFit=No, Sense=No, SMD=Yes, Socket=No
TP1 TP2 TP3 TP4 TP5 TP6 TP7 TP8 TP9 TP10 TP11 TP12 TP13 TP15 TP16 TP17 TP19: library part SMD_PAD_1.27X1.27MM, Author="CERN DEM JLC", ComponentHeight=0mm, Component Type="Standard (No BOM)", CreateDate=12.01.2008, Family="Test Point", HelpURL=Undefined, LatestRevisionDate=12.01.2008, Mounted=No, PackageDescription="1.27mm x 1.27mm PCB Copper Area (SMD Test Point)", Part Description="1.27mm x 1.27mm PCB Copper Area (SMD Test Point)", Part Number=SMD_PAD_1.27X1.27MM, Pin Count=1, Sense=No, SMD=Yes, Socket=No, Status=None
TP14: library part PLATED_HOLE1.0_PAD1.5, "Single Terminal Socket", Author="CERN DEM JLC", ComponentHeight=0mm, Component Type="Standard (No BOM)", CreateDate=30/10/2008, Family="Plated Hole", HelpURL=Undefined, LatestRevisionDate=30/10/2008, Mounted=No, PackageDescription="Plated Through Hole: Hole Dia.=1mm Pad Dia.=1.5mm,  IPC-7251 Level C", Part Description="Plated Through Hole: Hole Dia.=1mm Pad Dia.=1.5mm,  IPC-7251 Level C", Part Number=PLATED_HOLE1.0_PAD1.5, Pin Count=1, Sense=No, SMD=No, Socket=No, Status=None
W1: library part SAMTEC_HTSW-104-23-L-S, "4 Mini Wire-Wrap Contact Strip Header", Manufacturer=SAMTEC, Manufacturer Part Number=HTSW-104-23-L-S, Author="CERN DEM JLC", ComponentHeight=8.38mm, Component Type=Standard, CreateDate=22/02/2018, Family="Header 4", HelpURL=\\cern.ch\dfs\Applications\Altium\Datasheets\SAMTEC_HTSW-104-23-L-S.pdf, LatestRevisionDate=22/02/2018, Mounted=Yes, Part Description="4 Contacts, Pitch 2.54mm, Single Row  Through Mount Straight Header (Post Lead 5.84mm, Tail Lead 2.92mm, Insulator 2.54mm)", Part Number=SAMTEC_HTSW-104-23-L-S, Pin Count=4, PressFit=No, Sense=No, SMD=No, Socket=No, Status=Preferred, Status Comment="High Temperature"
WASHER2 WASHER4 WASHER6 WASHER8: library part Keystone_7687, "SMA_Shoulder Washer", Manufacturer="Custom 3D printed", Author=GK, Component Type=Mechanical, ComponentHeight=1.91mm, CreateDate=28.01.2016, HelpURL=\\cern.ch\dfs\Applications\Altium\Datasheets\AAVID-THERMALLOY_7721-7PPSG.pdf, LatestRevisionDate=28.01.2016, Manufacturer Part Number="Custom 3D printed", Mounted=Yes, PackageDescription="Polyphenylene Sulfide PPS Shoulder Washer", Part Description="Polyphenylene Sulfide PPS Shoulder Washer", Part Number="Custom 3D printed", Pin Count=0, PressFit=No, Sense=No, SMD=No, Socket=No, Status=None

## Free pads (board coordinates)
  round 6 hole 3.2: 0(58.4,7.6) 0(156.5,6) 0(156.5,94) 1(58.4,92.6) 3(28.4,7.6) 3(28.4,92.6)

## Via types
v1: diameter 0.5, hole 0.2, Top to Bot, tented both sides, 1045 vias
v2: diameter 0.8, hole 0.4, Top to Bot, tented both sides, 40 vias
v3: diameter 0.6, hole 0.3, Top to Bot, tented both sides, 27 vias
v4: diameter 1.27, hole 0.711, Top to Bot, tented both sides, 11 vias
v5: diameter 0.7, hole 0.5, Top to Bot, tented both sides, 10 vias

## Nets (pads, with @x,y where several pads share a name; then routed paths per layer and width w, separated by ;. In a path a pad name is that pad's centre, name@x,y a point inside that pad or via, vN(x,y) a via of type N, cw(c..) or ccw(c..) an arc to the next point about the centre after c; other vN are vias at no path point)
ADC_0_N: J16.3 J18.2 L2A.1 R49A.2 R54A.1 | length 85.8
  Top w0.16: J18.2@2,83.96 J18.2@7.08,83.96 J18.2@7.08,89.04 J18.2@2,89.04 ; R49A.2@13.67,77.245 L2A.1@14.975,77.245 14.975,77.07 15.095,76.95 15.121,76.95 15.215,76.856 15.215,76.491 v1@15.476,76.229 ; v1(15.376,76.129) 15.418,76.171 15.535,76.171 15.854,75.852 15.854,73.461 15.238,72.844 15.238,64.152 16.899,62.49 21.74,62.49 22.737,61.493 22.737,58.357 J16.3@21.73,57.35
  Bot w0.16: J18.2@2,83.96 2.065,84.025 4.54,84.025 7.078,81.488 11.477,81.488 18.448,74.517 18.448,65.136 22.727,60.856 22.727,60.317 22.737,60.307 22.737,58.357 J16.3@21.73,57.35 ; R54A.1@15.245,73.7 15.376,73.831 v1(15.376,76.129)
ADC_0_P: J16.2 J18.1 L2A.2 R57A.2 SW2A.1 | length 67.1
  Top w0.16: R57A.2@17.18,77.275 17.15,77.245 L2A.2@15.775,77.245 15.775,77.07 15.655,76.95 15.629,76.95 15.535,76.856 15.535,76.623 16.174,75.984 16.174,73.328 15.558,72.712 15.558,64.284 17.032,62.81 21.873,62.81 23.057,61.626 23.057,58.968 23.226,58.799 23.428,58.799 24.27,59.642 J16.2@24.27,59.89
  Bot w0.16: J18.1@4.54,86.5 4.54,84.652 7.384,81.808 11.609,81.808 18.768,74.649 18.768,65.268 23.047,60.989 23.047,60.45 23.057,60.44 23.057,59.253 23.199,59.111 23.491,59.111 J16.2@24.27,59.89
ADC_1_N: J16.6 J20.2 L2B.1 R49B.2 R54B.1 | length 91.5
  Top w0.16: J20.2@7.172,72.04 J20.2@7.08,72.04 J20.2@2,72.04 J20.2@2,66.96 J20.2@7.261,66.96 ; R49B.2@22.595,77.245 23.148,77.245 L2B.1@23.799,77.896 23.922,77.773 23.922,76.776 24.101,76.598 v1(24.101,76.504) 24.179,76.426 24.179,70.771 23.538,70.129 23.538,63.828 26.867,60.498 26.867,54.858 25.779,53.77 23.839,53.77 23.16,54.449 23.16,54.716 23.254,54.81 J16.6@24.27,54.81
  Bot w0.152: 23.925,75.344 24.101,75.521 v1(24.101,76.504)
  Bot w0.16: J20.2@2,72.04 6.12,72.04 7.22,70.94 7.22,67.1 J20.2@7.08,66.96 5.72,68.32 5.26,68.32 4.864,67.924 4.864,66.51 6.286,65.088 13.498,65.088 15.171,63.415 15.171,59.596 18.433,56.334 22.13,56.334 23.16,55.303 23.16,54.904 23.254,54.81 J16.6@24.27,54.81 ; R54B.1@23.7,73.6 23.925,73.825 23.925,74.335 23.925,75.344
ADC_1_P: J16.5 J20.1 L2B.2 R57B.2 SW2B.1 | length 65.1
  Top w0.16: J16.5@21.73,54.81 22.746,54.81 22.84,54.716 22.84,54.317 23.707,53.45 25.912,53.45 27.187,54.725 27.187,60.63 23.858,63.96 23.858,69.997 24.499,70.638 SW2B.1@24.499,74.951 ; L2B.2@24.364,78.462 24.576,78.251 24.576,75.294 SW2B.1@24.995,74.875 25.484,75.364 25.484,76.634 26.105,77.255 R57B.2@26.105,77.275
  Bot w0.16: J20.1@4.54,69.5 4.54,66.395 6.167,64.768 13.365,64.768 14.851,63.282 14.851,59.463 18.3,56.014 21.997,56.014 22.84,55.171 22.84,54.904 22.746,54.81 J16.5@21.73,54.81
ADC_AFE_CH1_nSHDN: IC27A.7 JB2.97 R53A.2 | length 102.6
  Top w0.125: IC27A.7@45.974,92.362 45.974,93.087 46.3,93.413 v1(46.3,93.725) ; JB2.97@117.475,70.404 117.475,71.383 v1(117.975,71.883)
  L3 w0.125: v1(46.3,93.725) 46.346,93.771 46.346,96.007 48.653,98.314 111.699,98.314 117.975,92.038 v1(117.975,71.883)
  Bot w0.125: R53A.2@117.451,70.355 117.451,71.048 117.974,71.571 117.974,71.882 v1(117.975,71.883)
ADC_AFE_CH2_nSHDN: IC27B.7 JB2.95 R53B.2 | length 112.4
  Top w0.125: IC27B.7@43.113,81.887 43.113,82.954 43.35,83.191 v1(43.35,83.2) ; JB2.95@116.975,70.404 116.975,71.672 117.173,71.871 v1(117.209,71.871)
  L3 w0.125: v1(43.35,83.2) 45.312,85.162 45.312,90.958 48.076,93.723 48.076,96.58 49.56,98.064 110.882,98.064 117.209,91.736 v1(117.209,71.871)
  Bot w0.125: R53B.2@116.455,70.355 116.455,71.152 117.173,71.871 v1(117.209,71.871)
ADC_AFE_IN_LA_N: C39A.2 C42A.2 IC28A.2 R42A.2 | length 19.3
  Top w0.16: R42A.2@22.15,89.375 22.52,89.005 22.52,88.841 22.604,88.757 23.857,88.757 C42A.2@24.125,89.025 ; C39A.2@24.14,90.115 24.14,89.04 C42A.2@24.125,89.025 ; IC28A.2@35.502,92.187 35.502,92.512 35.045,92.969 32.331,92.969 31.652,92.29 31.652,88.888 31.495,88.731 24.419,88.731 C42A.2@24.125,89.025
ADC_AFE_IN_LA_P: C42A.1 C47A.2 IC28A.10 R56A.2 | length 16.1
  Top w0.16: R56A.2@22.15,87.8 22.52,88.17 22.52,88.334 22.623,88.437 23.813,88.437 C42A.1@24.125,88.125 ; C47A.2@24.14,87.085 24.14,88.11 C42A.1@24.125,88.125 ; IC28A.10@34.852,88.437 34.844,88.429 34.844,87.361 34.537,87.055 32.964,87.055 31.6,88.419 24.419,88.419 C42A.1@24.125,88.125
ADC_AFE_IN_LB_N: C39B.2 C42B.2 IC28B.2 R42B.2 | length 11.1
  Top w0.16: R42B.2@26.475,83.7 26.849,83.326 26.849,83.195 26.938,83.106 27.154,83.106 28.109,83.106 28.231,83.106 C42B.2@28.525,83.4 ; C39B.2@28.54,84.49 28.54,83.415 C42B.2@28.525,83.4 ; IC28B.2@33.975,80.566 34.205,80.796 34.205,81.442 32.546,83.101 28.824,83.101 C42B.2@28.525,83.4
ADC_AFE_IN_LB_P: C42B.1 C47B.2 IC28B.10 R56B.2 | length 11
  Top w0.16: R56B.2@26.475,82.2 26.849,82.574 26.849,82.705 26.938,82.794 27.283,82.794 C42B.1@28.231,82.794 ; C42B.1@28.238,82.794 C42B.1@28.231,82.794 ; C47B.2@28.54,81.46 28.525,81.475 C42B.1@28.525,82.5 ; IC28B.10@30.864,78.374 30.852,78.374 30.097,77.619 29.663,77.619 29.458,77.825 29.168,78.115 29.168,82.531 28.992,82.707 28.732,82.707 C42B.1@28.525,82.5 ; C42B.1@28.231,82.794 C42B.1@28.525,82.5
ADC_AFE_IN_R2A_N: IC27A.1 R43A.1 R46A.2 SW1A.4 | length 5.9
  Top w0.16: R46A.2@44.024,89.375 44.024,88.635 44.174,88.484 44.448,88.484 v1(44.513,88.419) 45.19,88.419 45.324,88.285 45.324,87.158 45.542,86.94 45.542,85.637 R43A.1@45.499,85.594
  Bot w0.16: SW1A.4@43.862,87.867 43.862,87.917 44.299,88.354 44.448,88.354 v1(44.513,88.419)
ADC_AFE_IN_R2A_P: IC27A.8 R41A.1 R51A.2 SW3A.4 | length 6.3
  Top w0.152: R51A.2@43.963,91.412 43.963,91.462 44.863,92.362 IC27A.8@45.324,92.362 45.324,94.446 R41A.1@45.599,94.721
  Top w0.16: SW3A.4@43.509,93.075 43.326,92.893 43.593,92.626 43.593,91.782 R51A.2@43.963,91.412
ADC_AFE_IN_R2B_N: IC27B.1 R43B.1 R46B.2 SW1B.4 | length 6.6
  Top w0.16: v1(40.774,77.535) 40.774,77.627 40.9,77.753 R46B.2@40.9,78.43 ; R46B.2@40.9,78.48 R46B.2@40.9,78.43 ; R43B.1@42.7,74.875 42.463,75.112 IC27B.1@42.463,77.487 41.842,77.487 R46B.2@40.9,78.43
  Bot w0.16: v1(40.774,77.535) 40.774,76.757 SW1B.4@40.884,76.647
ADC_AFE_IN_R2B_P: IC27B.8 R41B.1 R51B.2 SW3B.4 | length 6.7
  Top w0.152: R51B.2@40.78,80.46 40.97,80.46 41.748,81.238 42.325,81.238 42.463,81.376 IC27B.8@42.463,81.887 42.463,84.065 R41B.1@42.563,84.165
  Top w0.16: SW3B.4@40.774,82.064 40.53,81.821 40.53,80.71 R51B.2@40.78,80.46
ADC_AFE_IN_RA_N: L2A.4 R42A.1 | length 13.9
  Top w0.16: L2A.4@14.975,79.095 14.975,79.27 15.099,79.394 15.13,79.394 15.219,79.483 15.219,83.73 17.18,85.691 17.18,88.099 17.829,88.747 20.086,88.747 20.18,88.841 20.18,89.005 R42A.1@20.55,89.375
ADC_AFE_IN_RA_P: L2A.3 R56A.1 | length 13.9
  Top w0.16: L2A.3@15.775,79.095 15.775,79.27 15.651,79.394 15.621,79.394 15.531,79.483 15.531,83.6 17.492,85.562 17.492,87.969 17.949,88.426 18.12,88.426 18.28,88.426 18.552,88.426 cw(c18.552,88.378) 18.6,88.378 18.6,88.174 ccw(c18.648,88.174) 18.648,88.126 18.872,88.126 ccw(c18.872,88.174) 18.92,88.174 18.92,88.378 cw(c18.968,88.378) 18.968,88.426 19.029,88.426 19.306,88.426 ; 19.306,88.427 20.086,88.427 20.18,88.334 20.18,88.17 R56A.1@20.55,87.8
ADC_AFE_IN_RB_N: L2B.4 R42B.1 | length 7.3
  Top w0.16: L2B.4@22.491,79.205 22.367,79.328 22.367,79.503 22.389,79.525 22.389,79.651 22.076,79.964 21.618,80.422 21.618,82.166 22.562,83.109 23.393,83.109 ; 23.394,83.11 24.411,83.11 24.505,83.204 24.505,83.33 R42B.1@24.875,83.7
ADC_AFE_IN_RB_P: L2B.3 R56B.1 | length 6.5
  Top w0.16: L2B.3@23.056,79.77 22.933,79.894 22.757,79.894 22.736,79.872 22.609,79.872 22.388,80.094 21.93,80.551 21.93,80.73 21.93,81.835 21.93,82.036 22.683,82.789 23.02,82.789 23.525,82.789 23.526,82.79 24.411,82.79 24.505,82.696 24.505,82.57 R56B.1@24.875,82.2
ADC_AFE_INA_N: IC28A.13 R45A.1 | length 1.8
  Top w0.16: IC28A.13@37.052,89.337 37.326,89.337 37.39,89.272 37.39,89.119 37.484,89.025 R45A.1@38.623,89.025
ADC_AFE_INA_P: IC28A.5 R50A.1 | length 11.5
  Top w0.16: v1(32.247,91.297) 33.292,91.297 IC28A.5@33.302,91.287 ; v1@37.921,93.37 v1(37.986,93.305) 38.051,93.24 38.051,92.824 38.85,92.025 R50A.1@38.85,91.975
  Bot w0.16: v1(32.247,91.297) 32.102,91.297 32.016,91.382 32.016,92.786 32.436,93.206 33.17,93.206 34.194,94.23 37.184,94.23 37.825,93.589 37.825,93.558 37.986,93.397 v1(37.986,93.305)
ADC_AFE_INB_N: IC28B.13 R45B.1 | length 3.3
  Top w0.16: IC28B.13@33.056,77.455 33.957,76.553 35.703,76.553 R45B.1@35.927,76.777
ADC_AFE_INB_P: IC28B.5 R50B.1 | length 7.6
  Top w0.16: v1(31.044,82.238) 31.783,81.499 IC28B.5@31.783,81.485 ; v1(35.63,83.702) 35.63,82.49 R50B.1@35.64,82.48
  Bot w0.16: v1(31.044,82.238) 31.044,82.247 31.386,82.589 31.386,82.809 32.279,83.702 v1(35.63,83.702)
ADC_AUX_A0: IC33.25 JB1.71 | length 58.2
  Top w0.125: JB1.71@110.975,38.404 v1(110.975,39.468)
  Bot w0.125: IC33.25@83.296,82.798 86.35,82.798 87.4,81.748 87.4,65.159 96.588,55.971 96.588,52.887 107.658,41.818 108.625,41.818 110.964,39.479 v1@110.964,39.468
ADC_AUX_A1: IC33.24 JB1.84 | length 66.7
  Top w0.125: v1(113.975,33.609) JB1.84@113.975,34.704
  Bot w0.125: IC33.24@82.596,83.498 82.596,83.294 82.654,83.236 86.431,83.236 87.877,81.789 87.877,75.271 88.062,75.086 88.062,69.885 87.848,69.671 87.848,66.256 88.549,65.556 88.549,64.938 92.389,61.098 92.92,61.098 96.606,57.412 96.606,56.88 97.75,55.736 97.75,54.35 107.45,44.65 107.45,44.404 112,39.854 112,39.189 112.975,38.214 112.975,34.628 113.975,33.628 v1(113.975,33.609)
ADC_AUX_A2: IC33.23 JB1.82 | length 66.1
  Top w0.125: JB1.82@113.475,34.704 v1(113.475,35.786)